# Altium PCB PCB.PcbDoc (part 2 of 2)
Units mm, origin at the board's own origin, x right, y up, seen from the top; angles counter-clockwise.
Board outline 78 x 99 mm, 2 copper layers (Top Layer, Bottom Layer); 105 components, 105 nets, 448 pads, 406 vias.
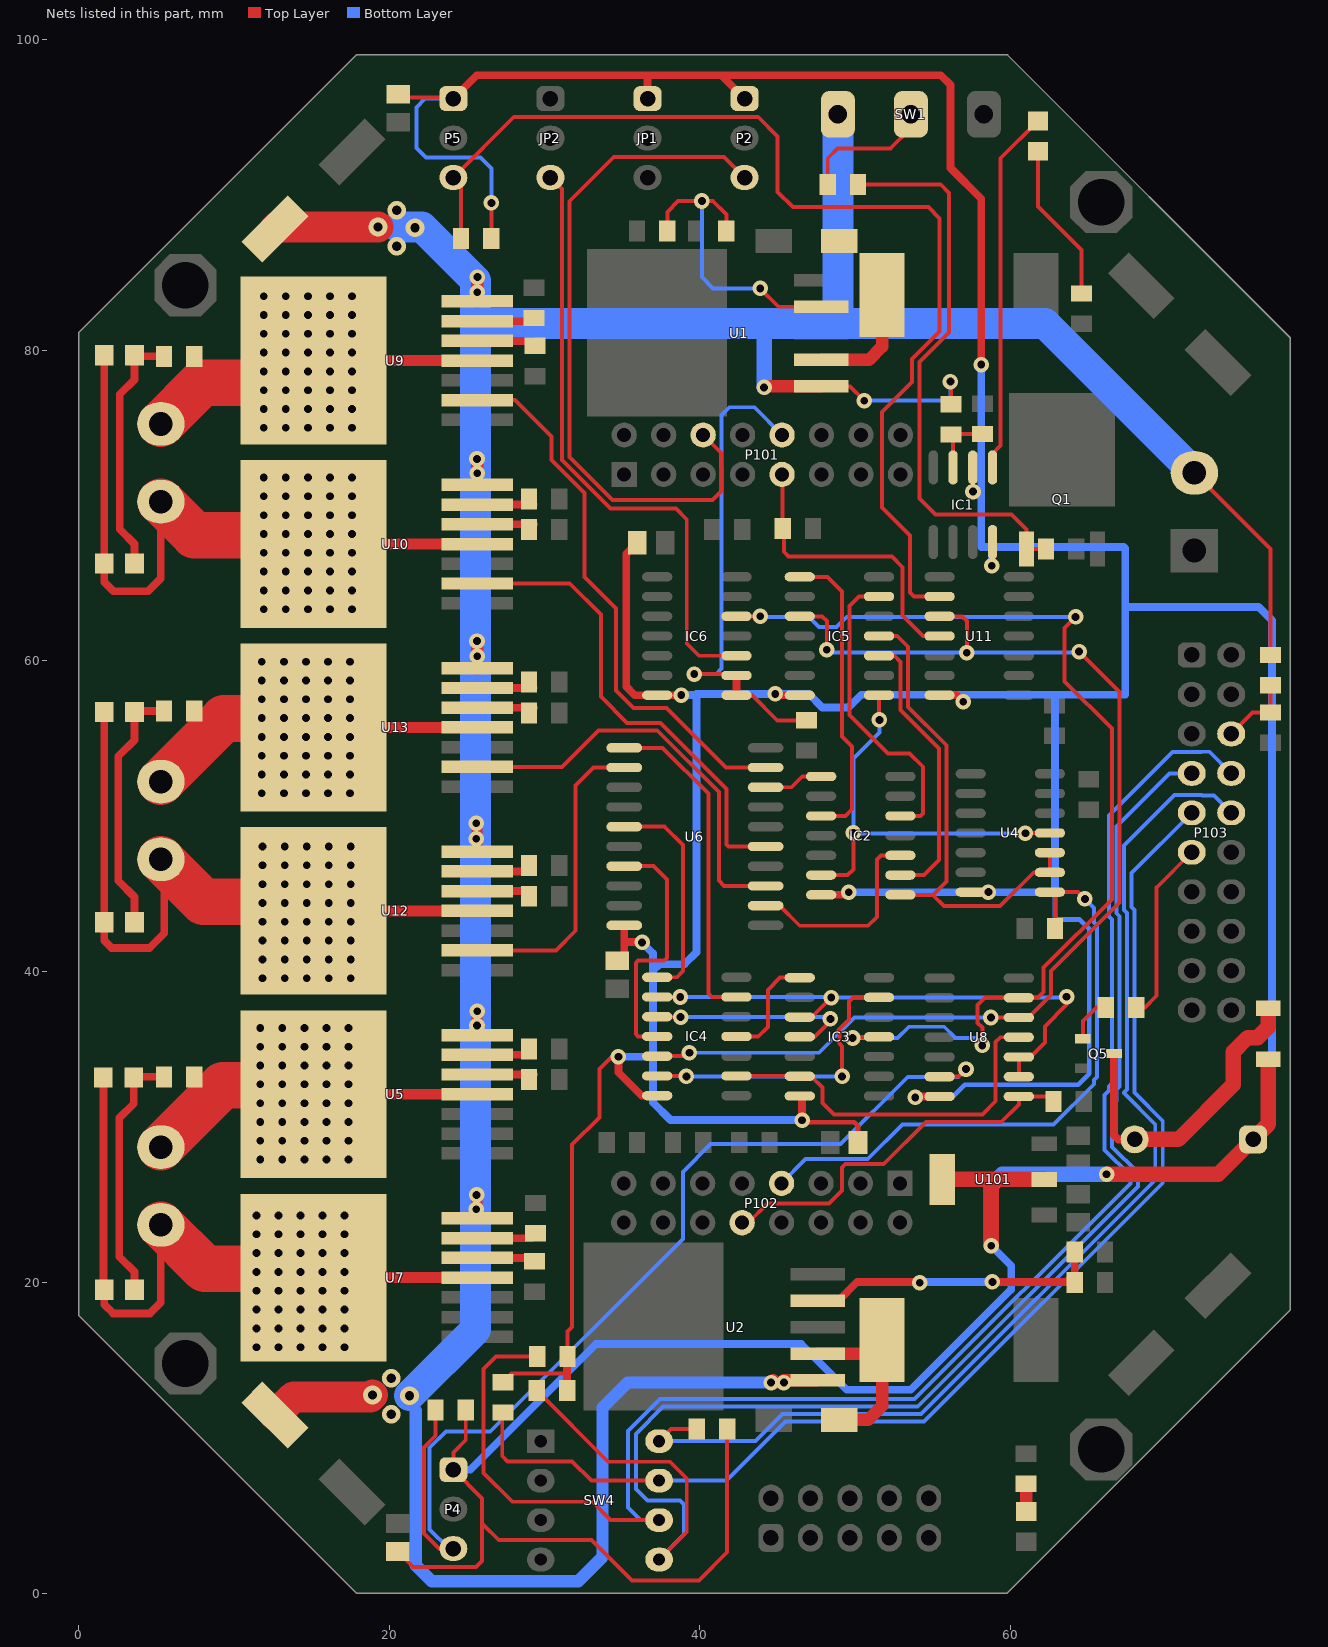
[diagram p2: the nets of this part, all layers, seen from the top]

## Via types
v1: diameter 1, hole 0.5, Top Layer to Bottom Layer, tented both sides, 398 vias
v2: diameter 1.2, hole 0.6, Top Layer to Bottom Layer, tented both sides, 8 vias

## Nets (pads, with @x,y where several pads share a name; then routed paths per layer and width w, separated by ;. In a path a pad name is that pad's centre, name@x,y a point inside that pad or via, vN(x,y) a via of type N, cw(c..) or ccw(c..) an arc to the next point about the centre after c; other vN are vias at no path point) (continued)
IN1B_: IC2.3 U6.2 | length 13.6
  Top Layer w0.254: U6.2@43.85,44.245 45.13,44.245 46.425,42.95 50.825,42.95 51.4,43.525 51.4,47.225 51.655,47.48 IC2.3@52.9,47.48
IN2A: U6.9 U9.2 | length 35.5
  Top Layer w0.254: U9.2@25.658,76.785 28.09,76.785 30.442,74.433 30.442,72.925 32.575,70.793 32.575,65.39 34.59,63.375 34.59,58.1 35.717,56.973 37.85,56.973 41.687,53.135 U6.9@44.225,53.135
IN2A_: IC4.6 U6.11 | length 20.6
  Top Layer w0.254: U6.11@35.925,54.405 37.595,54.405 40.543,51.457 40.543,38.582 40.76,38.365 IC4.6@42.35,38.365
IN2B: U6.5 U10.2 | length 30.8
  Top Layer w0.254: U10.2@25.658,64.98 31.62,64.98 33.625,62.975 33.625,57.7 35.317,56.008 37.45,56.008 41.708,51.75 41.708,48.175 41.828,48.055 U6.5@44.225,48.055
IN2B_: IC4.8 U6.15 | length 13.4
  Top Layer w0.254: U6.15@35.925,49.325 37.725,49.325 38.9,48.15 38.9,40.025 38.51,39.635 IC4.8@37.25,39.635
IN3A: U6.12 U12.2 | length 19.8
  Top Layer w0.254: U12.2@25.658,41.37 30.745,41.37 32.002,42.627 32.002,51.977 33.16,53.135 U6.12@35.125,53.135
IN3A_: IC2.8 U6.8 | length 4.2
  Top Layer w0.254: U6.8@43.85,51.865 45.89,51.865 46.585,52.56 IC2.8@47.8,52.56
IN3B: U6.3 U13.2 | length 27
  Top Layer w0.254: U13.2@25.658,53.175 31.125,53.175 33.475,55.525 37.25,55.525 41.225,51.55 41.225,45.85 41.56,45.515 U6.3@44.225,45.515
IN3B_: IC4.11 U6.17 | length 15.5
  Top Layer w0.254: U6.17@35.925,46.785 37.015,46.785 37.875,45.925 37.875,40.875 37.7,40.7 36.025,40.7 35.875,40.55 35.875,35.975 36.025,35.825 IC4.11@37.25,35.825
IS1: R32.1 U5.6 | length 3.6
  Top Layer w0.5: U5.6@25.658,34.645 R32.1@29.27,34.645
IS2: R35.1 U7.6 | length 3.5
  Top Layer w0.5: U7.6@25.658,22.84 R35.1@29.19,22.84
IS3: R38.1 U9.6 | length 3.6
  Top Layer w0.5: U9.6@25.658,81.865 R38.1@29.265,81.865
IS4: R41.1 U10.6 | length 3.6
  Top Layer w0.5: U10.6@25.658,70.06 R41.1@29.285,70.06
IS5: R45.2 U12.6 | length 3.6
  Top Layer w0.5: U12.6@25.658,46.45 R45.2@29.275,46.45
IS6: R43.2 U13.6 | length 3.6
  Top Layer w0.5: U13.6@25.658,58.255 R43.2@29.28,58.255
M1A: P3.1 R33.2 U5.4 U5.8 | length 23.5
  Top Layer w0.5: U5.8@15.117,32.105 U5.8@17.525,32.105
  Top Layer w0.7: U5.8@17.525,32.105 U5.4@25.658,32.105
  Top Layer w3: P3.1@5.3,28.7 9.28,32.68 U5.8@16.567,32.68
  other v1: 11.7,27.9 13.119,27.9 14.537,27.9 15.956,27.9 17.375,27.9 11.7,29.111 13.119,29.111 14.537,29.111 15.956,29.111 17.375,29.111 11.7,30.321 13.119,30.321 14.537,30.321 15.956,30.321 17.375,30.321 11.7,31.532 13.119,31.532 14.537,31.532 15.956,31.532 17.375,31.532 11.7,32.743 13.119,32.743 14.537,32.743 15.956,32.743 17.375,32.743 11.7,33.954 13.119,33.954 14.537,33.954 15.956,33.954 17.375,33.954 11.7,35.164 13.119,35.164 14.537,35.164 15.956,35.164 17.375,35.164 11.7,36.375 13.119,36.375 14.537,36.375 15.956,36.375 17.375,36.375
M1B: D14.1 D15.2 P3.2 U7.4 U7.8 | length 46.8
  Top Layer w0.5: D15.2@1.6,33.175 1.6,19.575 D14.1@1.65,19.525 1.65,18.575 2.225,18 4.6,18 5.3,18.7 P3.2@5.3,23.7 ; U7.8@15.117,20.3 U7.8@17.975,20.3
  Top Layer w0.6: U7.8@17.975,20.3 U7.8@18.875,20.3
  Top Layer w0.7: U7.8@18.875,20.3 U7.4@25.658,20.3
  Top Layer w3: P3.2@5.3,23.7 8.125,20.875 U7.8@16.567,20.875
  other v1: 11.45,15.825 12.869,15.825 14.287,15.825 15.706,15.825 17.125,15.825 11.45,17.036 12.869,17.036 14.287,17.036 15.706,17.036 17.125,17.036 11.45,18.246 12.869,18.246 14.287,18.246 15.706,18.246 17.125,18.246 11.45,19.457 12.869,19.457 14.287,19.457 15.706,19.457 17.125,19.457 11.45,20.668 12.869,20.668 14.287,20.668 15.706,20.668 17.125,20.668 11.45,21.879 12.869,21.879 14.287,21.879 15.706,21.879 17.125,21.879 11.45,23.089 12.869,23.089 14.287,23.089 15.706,23.089 17.125,23.089 11.45,24.3 12.869,24.3 14.287,24.3 15.706,24.3 17.125,24.3
M2A: P6.1 R39.2 U9.4 U9.8 | length 23.7
  Top Layer w0.7: U9.8@15.117,79.325 U9.4@25.658,79.325
  Top Layer w3: P6.1@5.3,75.25 7.95,77.9 U9.8@14.567,77.9 ; U9.8@13.117,77.325 U9.8@15.117,79.325
  other v1: 11.925,75 13.344,75 14.762,75 16.181,75 17.6,75 11.925,76.211 13.344,76.211 14.762,76.211 16.181,76.211 17.6,76.211 11.925,77.421 13.344,77.421 14.762,77.421 16.181,77.421 17.6,77.421 11.925,78.632 13.344,78.632 14.762,78.632 16.181,78.632 17.6,78.632 11.925,79.843 13.344,79.843 14.762,79.843 16.181,79.843 17.6,79.843 11.925,81.054 13.344,81.054 14.762,81.054 16.181,81.054 17.6,81.054 11.925,82.264 13.344,82.264 14.762,82.264 16.181,82.264 17.6,82.264 11.925,83.475 13.344,83.475 14.762,83.475 16.181,83.475 17.6,83.475
M2B: D16.1 D17.2 P6.2 U10.4 U10.8 | length 46.5
  Top Layer w0.5: D17.2@1.65,79.675 D16.1@1.65,66.275 1.65,65.075 2.25,64.475 4.475,64.475 5.3,65.3 P6.2@5.3,70.25
  Top Layer w0.7: U10.8@15.117,67.52 16.567,67.52 U10.4@25.658,67.52
  Top Layer w3: P6.2@5.3,70.25 7.455,68.095 11.925,68.095 13.344,68.095 15.117,68.095 U10.8@16.567,68.095
  other v1: 11.925,63.325 13.344,63.325 14.762,63.325 16.181,63.325 17.6,63.325 11.925,64.536 13.344,64.536 14.762,64.536 16.181,64.536 17.6,64.536 11.925,65.746 13.344,65.746 14.762,65.746 16.181,65.746 17.6,65.746 11.925,66.957 13.344,66.957 14.762,66.957 16.181,66.957 17.6,66.957 11.925,68.168 13.344,68.168 14.762,68.168 16.181,68.168 17.6,68.168 11.925,69.379 13.344,69.379 14.762,69.379 16.181,69.379 17.6,69.379 11.925,70.589 13.344,70.589 14.762,70.589 16.181,70.589 17.6,70.589 11.925,71.8 13.344,71.8 14.762,71.8 16.181,71.8 17.6,71.8
M3A: D18.1 D19.2 P7.2 U12.4 U12.8 | length 47
  Top Layer w0.5: D19.2@1.65,56.7 D18.1@1.65,43.175 1.65,42 2.125,41.525 4.575,41.525 5.525,42.475 5.525,47 P7.2@5.3,47.225 ; U12.8@15.117,43.91 U12.8@16.975,43.91
  Top Layer w0.7: U12.8@16.975,43.91 U12.4@25.658,43.91
  Top Layer w3: P7.2@5.3,47.225 8.04,44.485 U12.8@16.567,44.485
  other v1: 11.85,39.575 13.269,39.575 14.687,39.575 16.106,39.575 17.525,39.575 11.85,40.786 13.269,40.786 14.687,40.786 16.106,40.786 17.525,40.786 11.85,41.996 13.269,41.996 14.687,41.996 16.106,41.996 17.525,41.996 11.85,43.207 13.269,43.207 14.687,43.207 16.106,43.207 17.525,43.207 11.85,44.418 13.269,44.418 14.687,44.418 16.106,44.418 17.525,44.418 11.85,45.629 13.269,45.629 14.687,45.629 16.106,45.629 17.525,45.629 11.85,46.839 13.269,46.839 14.687,46.839 16.106,46.839 17.525,46.839 11.85,48.05 13.269,48.05 14.687,48.05 16.106,48.05 17.525,48.05
M3B: P7.1 R46.2 U13.4 U13.8 | length 23.5
  Top Layer w0.7: U13.8@15.117,55.715 U13.4@25.658,55.715
  Top Layer w3: P7.1@5.3,52.225 9.365,56.29 U13.8@16.567,56.29
  other v1: 11.8,51.475 13.219,51.475 14.637,51.475 16.056,51.475 17.475,51.475 11.8,52.686 13.219,52.686 14.637,52.686 16.056,52.686 17.475,52.686 11.8,53.896 13.219,53.896 14.637,53.896 16.056,53.896 17.475,53.896 11.8,55.107 13.219,55.107 14.637,55.107 16.056,55.107 17.475,55.107 11.8,56.318 13.219,56.318 14.637,56.318 16.056,56.318 17.475,56.318 11.8,57.529 13.219,57.529 14.637,57.529 16.056,57.529 17.475,57.529 11.8,58.739 13.219,58.739 14.637,58.739 16.056,58.739 17.475,58.739 11.8,59.95 13.219,59.95 14.637,59.95 16.056,59.95 17.475,59.95
NetBZ1_2: BZ1.2 D13.1 Q5.3 | length 20.7
  Top Layer w0.5: Q5.3@66.65,34.725 66.65,29.475 66.925,29.2 BZ1.2@67.98,29.2
  Top Layer w1: BZ1.2@67.98,29.2 70.8,29.2 74.325,32.725 74.325,34.825 75.25,35.75 75.9,35.75 76.575,36.425 D13.1@76.575,37.65
NetD1_2: D1.2 L1.1 U1.2 | length 7.6
  Top Layer w0.8: U1.2@47.814,79.378 50.878,79.378 51.725,80.225 L1.1@51.725,83.55
NetD2_1: D2.1 R3.1 | length 1.8
  Top Layer w0.8: D2.1@61,5.25 R3.1@61,7.025
NetD3_2: D3.2 L2.1 U2.2 | length 11.9
  Top Layer w0.8: U2.2@47.589,15.403 50.853,15.403 L2.1@51.725,16.275 51.725,12.05 50.825,11.15 D3.2@48.95,11.15
NetD14_2: D14.2 D15.1 R33.1 | length 16.4
  Top Layer w0.5: D14.2@3.6,19.525 3.6,20.675 2.625,21.65 2.625,30.575 3.55,31.5 D15.1@3.55,33.175 3.6,33.225 R33.1@5.5,33.225
NetD16_2: D16.2 D17.1 R39.1 | length 16.1
  Top Layer w0.5: D16.2@3.6,66.275 3.6,67.525 2.65,68.475 2.65,77.15 3.6,78.1 D17.1@3.6,79.675 3.675,79.6 R39.1@5.5,79.6
NetD18_2: D18.2 D19.1 R46.1 | length 16.3
  Top Layer w0.5: D18.2@3.6,43.175 3.6,44.8 2.55,45.85 2.55,53.85 3.6,54.9 D19.1@3.6,56.7 3.675,56.775 R46.1@5.5,56.775
NetIC1_1: IC1.1 LED1.2 | length 23.5
  Top Layer w0.254: IC1.1@58.83,72.45 58.83,73.33 59.35,73.85 59.35,92.35 LED1.2@61.75,94.75
NetIC1_3: IC1.3 R5.1 R505.2 | length 4.2
  Top Layer w0.254: IC1.3@56.29,72.45 56.29,74.435 R5.1@56.15,74.575 56.175,74.6 R505.2@58.175,74.6
NetIC2_2: IC2.2 IC5.3 | length 18.2
  Top Layer w0.254: IC5.3@51.525,60.33 52.52,60.33 52.91,59.94 52.91,56.833 55.375,54.368 55.375,47.175 54.425,46.225 52.915,46.225 IC2.2@52.9,46.21
NetIC2_5: IC2.5 IC5.6 | length 19.8
  Top Layer w0.254: IC5.6@51.525,64.14 50.24,64.14 49.633,63.533 49.633,56.51 52.093,54.05 53.485,54.05 54.35,53.185 54.35,50.175 54.195,50.02 IC2.5@52.9,50.02
NetIC2_10: IC2.10 IC5.8 | length 19.6
  Top Layer w0.254: IC5.8@46.425,65.41 48.215,65.41 49.15,64.475 49.15,55.135 49.8,54.485 49.8,50.45 49.37,50.02 IC2.10@47.8,50.02
NetIC3_6: IC3.6 IC4.13 | length 19.2
  Top Layer w0.254: IC4.13@37.25,33.285 39.09,33.285 v1(39.125,33.25) ; v1(49.15,33.25) 49.15,35.19 48.969,35.371 48.969,36.206 48.925,36.25 49.6,36.925 49.6,38.075 49.865,38.34 IC3.6@51.525,38.34
  Bottom Layer w0.254: v1(39.125,33.25) 39.175,33.3 39.225,33.25 v1(49.15,33.25)
NetIC3_8: IC3.8 IC4.4 | length 7
  Top Layer w0.254: IC4.4@42.35,35.825 43.75,35.825 44.367,36.442 44.367,38.817 45.16,39.61 IC3.8@46.425,39.61
NetIC3_11: IC3.11 IC4.10 | length 13.7
  Top Layer w0.254: IC4.10@37.25,37.095 v1@38.28,37.095 ; IC3.11@46.425,35.8 47.375,35.8 48.4,36.825 v1(48.4,36.95)
  Bottom Layer w0.254: v1(38.75,37.075) 48.6,37.075 48.475,36.95 v1(48.4,36.95)
NetIC6_3: IC6.3 JP2.3 | length 39.6
  Top Layer w0.254: JP2.3@30.375,91.11 31.125,90.36 31.125,72.925 34.25,69.8 38.45,69.8 39.15,69.1 39.15,61.125 39.945,60.33 IC6.3@42.35,60.33
NetLED1_1: LED1.1 R4.1 | length 10.3
  Top Layer w0.254: LED1.1@61.75,92.8 61.75,89.25 64.55,86.45 R4.1@64.55,83.65
NetP4_3: P4.3 R110.2 U8.13 | length 66.9
  Top Layer w0.254: R110.2@22.975,11.775 22.975,10.125 22.225,9.375 22.225,3.825 23.19,2.86 P4.3@24.125,2.86 ; U8.13@55.425,33.235 56.635,33.235 v1(57.125,33.725)
  Bottom Layer w0.254: P4.3@24.125,2.86 23.84,2.86 22.6,4.1 22.6,9.35 23.65,10.4 26.5,10.4 38.9,22.8 38.9,27.1 40.69,28.89 49.04,28.89 53.375,33.225 56.625,33.225 v1(57.125,33.725)
NetP5_3: P5.3 R111.2 U11.9 | length 70.2
  Top Layer w0.254: R111.2@24.625,87.2 24.625,90.61 P5.3@24.125,91.11 28.015,95 43.75,95 44.987,93.762 44.987,90.188 45.975,89.2 54.7,89.2 55.425,88.475 55.425,81.207 53.642,79.425 53.642,77.942 51.725,76.025 51.725,69.875 53.533,68.067 53.533,64.392 53.785,64.14 U11.9@55.425,64.14
NetQ1_1: Q1.1 R1.1 R2.2 | length 36.8
  Top Layer w0.254: R1.1@50.175,90.65 55.5,90.65 56.025,90.125 56.025,81.125 54.125,79.225 54.125,70.45 55.162,69.413 60.062,69.413 61.02,68.455 Q1.1@61.02,67.2 R2.2@62.275,67.2
NetQ5_1: Q5.1 R30.2 | length 3
  Top Layer w0.254: Q5.1@64.65,35.675 64.65,36.825 65.525,37.7 R30.2@66.125,37.7
NetR1_2: R1.2 SW1.2 | length 8.7
  Top Layer w0.254: R1.2@48.225,90.65 48.225,92.35 48.85,92.975 52.25,92.975 53.575,94.3 SW1.2@53.575,95.175
NetR501_1: R501.1 R502.2 U2.4 | length 19.1
  Top Layer w0.5: U2.4@47.589,18.818 48.918,18.818 50.125,20.025 v1@54.15,20.025 ; v1(58.825,20.025) 64.075,20.025 R501.1@64.125,19.975 R502.2@64.125,21.95
  Bottom Layer w0.5: v1(54.15,19.975) 54.2,20.025 v1(58.825,20.025)
NetR503_1: R503.1 R504.2 U1.4 | length 20.1
  Top Layer w0.254: R503.1@37.9,87.675 37.9,88.9 38.6,89.6 v1(40.125,89.6) 40.825,89.6 41.7,88.725 R504.2@41.7,87.675 ; v1(43.875,83.975) 45.057,82.793 U1.4@47.814,82.793
  Bottom Layer w0.254: v1(40.125,89.6) 40.125,84.7 40.85,83.975 v1(43.875,83.975)
P1: IC2.13 IC5.1 U4.4 | length 26.8
  Top Layer w0.254: IC2.13@47.8,46.21 49.51,46.21 49.875,46.575 v1(49.875,48.925) ; IC5.1@51.525,57.79 51.525,56.225 v1(51.55,56.2) ; v1(60.95,48.9) 60.975,48.925 U4.4@62.525,48.925
  Bottom Layer w0.254: v1(51.55,56.2) 51.55,55.4 49.875,53.725 v1(49.875,48.925) 49.9,48.9 v1(60.95,48.9)
P1~: IC2.1 IC5.4 U4.2 U4.3 | length 31.6
  Top Layer w0.254: IC5.4@51.525,61.6 52.7,61.6 53.392,60.908 53.392,57.033 55.858,54.567 55.858,45.808 54.99,44.94 54.985,44.94 ; IC2.1@52.9,44.94 54.985,44.94 ; U4.3@62.525,47.655 U4.2@62.525,46.385 61.485,46.385 59.325,44.225 55.7,44.225 54.985,44.94
P2: IC3.13 IC4.2 U8.4 | length 24.1
  Top Layer w0.254: IC4.2@42.4,33.335 IC4.2@42.35,33.285 46.4,33.285 IC3.13@46.425,33.26 47.165,33.26 47.875,32.55 47.875,31.55 48.625,30.8 58.175,30.8 59.031,31.656 59.031,35.456 59.35,35.775 U8.4@60.525,35.775
P2~: IC3.10 IC4.9 U8.2 U8.3 | length 36.4
  Top Layer w0.254: IC4.9@37.25,38.365 v1(38.725,38.365) ; IC3.10@46.425,37.07 47.195,37.07 v1(48.45,38.325) ; U8.2@60.525,33.235 U8.3@60.525,34.505 61.28,34.505 62.2,35.425 62.2,36.475 63.6,37.875 v1(63.6,38.375)
  Bottom Layer w0.254: v1(38.725,38.365) 48.41,38.365 v1(48.45,38.325) 63.9,38.325 63.85,38.375 v1(63.6,38.375)
P3: IC3.4 IC6.5 U8.6 | length 68.1
  Top Layer w0.254: IC6.5@42.35,62.87 v1(43.875,62.87) ; v1(49.825,35.725) 49.9,35.8 IC3.4@51.525,35.8 ; v1(58.175,35.25) 58.175,36.39 57.874,36.691 57.874,37.839 58.35,38.315 U8.6@60.525,38.315 61.74,38.315 62.117,38.692 62.117,40.25 66.51,44.642 66.51,55.64 63.475,58.675 63.475,62.125 v1(64.175,62.825)
  Bottom Layer w0.254: v1(43.875,62.87) 43.92,62.825 47.025,62.825 47.675,62.175 48.8,62.175 49.45,62.825 v1(64.175,62.825) ; v1(49.825,35.725) 52.725,35.725 53.45,36.45 55.725,36.45 56.425,35.75 56.425,35.725 57.7,35.725 v1(58.175,35.25)
P3~: IC4.12 IC5.10 U8.5 U11.10 | length 76
  Top Layer w0.254: IC4.12@37.25,34.555 39.105,34.555 v1(39.325,34.775) ; IC5.10@46.425,62.87 47.855,62.87 48.167,62.558 v1(48.167,60.711) ; U11.10@55.425,62.87 56.88,62.87 57.175,62.575 v1(57.175,60.525) ; v1(58.73,37.045) U8.5@60.525,37.045 61.152,37.045 62.6,38.493 62.6,40.05 66.992,44.442 66.992,58.008 v1(64.4,60.6)
  Bottom Layer w0.254: v1(39.325,34.775) 47.665,34.775 49.935,37.045 v1(58.73,37.045) ; v1(48.167,60.711) 48.189,60.711 48.375,60.525 v1(57.175,60.525) 64.325,60.525 v1(64.4,60.6)
PWM1: P102.7 R101.2 U4.1 | length 40.4
  Top Layer w0.254: R101.2@62.85,42.35 R101.2@62.85,42.775 62.85,44.79 U4.1@62.525,45.115 64.335,45.115 v1(64.775,44.675)
  Bottom Layer w0.254: P102.7@45.255,26.375 46.805,27.925 50.8,27.925 53.033,30.158 62.768,30.158 65.36,32.75 65.36,33.02 65.556,33.216 65.556,42.964 65.36,43.159 65.36,44.09 v1(64.775,44.675)
PWM2: P102.10 R102.2 U8.1 | length 24.7
  Top Layer w0.254: P102.10@42.715,23.835 43.11,23.835 44.35,25.075 48.3,25.075 49.144,25.919 49.144,27.397 49.353,27.606 51.831,27.606 54.542,30.317 59.392,30.317 60.525,31.45 U8.1@60.525,31.965 62.435,31.965 R102.2@62.75,31.65
PWM3: P101.9 R103.2 U11.11 | length 19.1
  Top Layer w0.254: P101.9@45.285,72 45.325,71.96 R103.2@45.325,68.525 45.4,68.45 45.4,67.025 45.7,66.725 52.35,66.725 53.05,66.025 53.05,62.907 54.357,61.6 U11.11@55.425,61.6
SERVO: IC6.1 IC6.2 P101.10 R36.1 | length 32.7
  Top Layer w0.254: v1(39.625,59.15) 42.04,59.15 42.24,58.95 IC6.2@42.35,59.06 ; IC6.1@42.35,57.79 43.36,57.79 44.975,56.175 R36.1@46.85,56.175
  Top Layer w0.5: IC6.1@42.35,57.79 IC6.2@42.35,59.06
  Bottom Layer w0.254: v1@39.575,59.15 39.575,58.975 39.625,59.025 v1(39.625,59.15) 41.05,59.15 41.4,59.5 41.4,75.825 41.9,76.325 43.5,76.325 P101.10@45.285,74.54
SPK: P103.11 R30.1 | length 11.8
  Top Layer w0.254: R30.1@68.075,37.7 68.65,37.7 69.4,38.45 69.4,45.425 P103.11@71.655,47.68
SR1: R31.1 U5.5 | length 3.7
  Top Layer w0.5: U5.5@25.658,33.375 R31.1@29.325,33.375
SR2: R34.1 U7.5 | length 3.7
  Top Layer w0.5: U7.5@25.658,21.57 R34.1@29.355,21.57
SR3: R37.1 U9.5 | length 3.7
  Top Layer w0.5: U9.5@25.658,80.595 R37.1@29.33,80.595
SR4: R40.1 U10.5 | length 3.7
  Top Layer w0.5: U10.5@25.658,68.79 R40.1@29.31,68.79
SR5: R44.2 U12.5 | length 3.5
  Top Layer w0.5: U12.5@25.658,45.18 R44.2@29.125,45.18
SR6: R42.2 U13.5 | length 3.7
  Top Layer w0.5: U13.5@25.658,56.985 R42.2@29.315,56.985
STEER_VR: P2.3 P101.6 | length 44.7
  Top Layer w0.254: P101.6@40.205,74.54 41.35,73.395 41.35,72.507 41.373,72.484 41.373,70.923 40.809,70.359 34.374,70.359 31.608,73.125 31.608,89.583 34.45,92.425 41.56,92.425 P2.3@42.875,91.11
SW1: P103.7 R13.2 SW4.5 | length 98.5
  Top Layer w0.254: R13.2@29.5,13.025 34.075,8.45 38.075,8.45 39.15,7.375 39.15,3.935 SW4.5@37.37,2.155
  Bottom Layer w0.254: SW4.5@37.37,2.155 38.975,3.76 38.975,5.7 38.725,5.95 36.625,5.95 35.875,6.7 35.875,10.242 37.626,11.993 54.018,11.993 68.188,26.162 68.188,27.062 66.533,28.717 66.533,31.4 66.81,31.677 66.81,32.422 67.003,32.616 67.003,43.563 66.81,43.757 66.81,49.335 70.235,52.76 P103.7@71.655,52.76
SW2: P103.8 R15.2 SW4.6 | length 104
  Top Layer w0.254: R15.2@29.525,15.225 26.875,15.225 26.075,14.425 26.075,7.725 27.925,5.875 33.075,5.875 34.255,4.695 SW4.6@37.37,4.695
  Bottom Layer w0.254: SW4.6@37.37,4.695 36.18,4.695 35.375,5.5 35.375,10.425 37.426,12.476 53.819,12.476 67.705,26.362 67.705,26.863 66.05,28.518 66.05,32.065 66.325,32.34 66.325,32.62 66.521,32.816 66.521,43.363 66.325,43.559 66.325,50.05 70.419,54.144 72.239,54.144 72.245,54.15 72.805,54.15 P103.8@74.195,52.76
SW3: P103.9 R20.2 SW4.7 | length 80.3
  Top Layer w0.254: R20.2@26.9,11.6 27.275,11.225 27.275,8.825 27.625,8.475 31.775,8.475 33.015,7.235 SW4.7@37.37,7.235
  Bottom Layer w0.254: SW4.7@37.37,7.235 41.71,7.235 45.503,11.028 54.418,11.028 69.789,26.399 69.789,30.371 67.956,32.204 67.969,32.216 67.969,43.963 67.775,44.157 67.775,46.34 P103.9@71.655,50.22
SW4: P103.10 R23.2 SW4.8 | length 72.9
  Top Layer w0.254: SW4.8@37.37,9.775 38.145,10.55 R23.2@39.8,10.55
  Bottom Layer w0.254: SW4.8@37.37,9.775 43.567,9.775 45.303,11.511 54.218,11.511 69.307,26.599 69.307,30.171 67.292,32.185 67.292,32.222 67.486,32.416 67.486,43.763 67.292,43.957 67.292,48.117 70.551,51.376 72.284,51.376 72.335,51.325 73.09,51.325 P103.10@74.195,50.22
V_IN: C1.1 C4.1 P1.2 R5.2 R9.2 SW1.3 U1.1 U2.1 U5.7 U7.7 U9.7 U10.7 U12.7 U13.7 | length 247.4
  Top Layer w0.254: U1.1@47.814,77.671 49.654,77.671 v1(50.575,76.75) ; v1(56.125,77.975) 56.15,77.95 R5.2@56.15,76.525 ; P1.2@71.825,72.1 76.725,67.2 R9.2@76.725,60.375
  Top Layer w0.7: v1(25.6,49.55) 25.658,49.492 U12.7@25.658,47.72 ; v1(25.625,25.625) 25.658,25.592 U7.7@25.658,24.11 ; U5.7@25.658,35.915 v1(25.658,37.442)
  Top Layer w0.8: v1(25.65,61.275) 25.658,61.267 U13.7@25.658,59.525 ; v1(25.65,73) 25.658,72.992 U10.7@25.658,71.33 ; U9.7@25.658,83.135 25.658,84.683 v1(25.675,84.7) ; v1(44.125,77.6) 44.196,77.671 U1.1@47.814,77.671 ; v1@44.721,13.696 v1(44.575,13.55) v1(45.404,13.55) ; v1@45.404,13.696 U2.1@47.589,13.696
  Top Layer w2: C4.1@12.65,11.45 13.825,12.625 18.8,12.625 v2(18.925,12.75) ; C1.1@12.65,87.8 12.775,87.925 v2(19.275,87.925)
  Bottom Layer w0.254: v1(50.575,76.75) 55.9,76.75 56.125,76.975 v1(56.125,77.975)
  Bottom Layer w0.8: 21.7,11.725 21.7,1.8 22.744,0.756 32.156,0.756 33.725,2.325 33.725,11.925 35.35,13.55 v1(44.575,13.55)
  Bottom Layer w1: v1(44.125,77.6) 44.125,81.713
  Bottom Layer w2: 20.6,87.925 22.1,87.925 25.55,84.475 25.55,81.713 ; v2(21.304,12.704) 25.55,16.95 25.55,81.713 ; SW1.3@48.875,95.175 48.875,82.038 49.2,81.713 ; P1.2@71.825,72.1 62.212,81.713 49.2,81.713 ; 25.55,81.713 44.125,81.713 49.2,81.713
  other v1: 25.6,24.7 25.65,36.525 25.6,48.55 25.658,60.3 25.658,72.075 25.658,83.725
  other v2: 20.129,11.504 20.125,13.825 20.479,86.679 21.654,87.879 20.475,89
VBAT: P103.6 R9.1 R11.2 | length 4.8
  Top Layer w0.254: P103.6@74.195,55.3 75.57,56.675 R11.2@76.725,56.675 R9.1@76.725,58.425
VCC: BZ1.1 C103.1 C104.1 C105.1 C106.1 C107.1 D13.2 IC1.2 IC1.8 IC2.14 IC3.14 IC4.14 IC5.14 IC6.14 JP1.1 P2.1 P4.1 P5.1 R13.1 R15.1 R20.1 R23.1 R110.1 R111.1 U4.14 U6.20 U8.14 U11.14 U101.2 U101.4 | length 462.2
  Top Layer w0.254: C106.1@20.475,96.25 24.065,96.25 P5.1@24.125,96.19 ; C107.1@20.55,2.675 21.544,1.681 25.581,1.681 25.975,2.075 25.975,4.475 ; R110.1@24.925,11.775 24.925,9.85 24.125,9.05 P4.1@24.125,7.94 25.975,6.09 25.975,4.475 ; R111.1@26.575,87.2 v1(26.575,89.475) ; R20.1@27.325,13.575 27.875,14.125 31.35,14.125 31.45,14.025 ; R15.1@31.475,15.225 31.475,16.825 31.775,17.125 31.775,28.868 33.523,30.615 33.523,33.723 34.325,34.525 v1(34.75,34.525) ; R23.1@41.75,10.55 41.75,2.625 39.925,0.8 35.625,0.8 33.025,3.4 27.05,3.4 25.975,4.475
  Top Layer w0.3: v1(46.575,30.425) 46.706,30.294 49.925,30.294 50.175,30.044 C105.1@50.175,29
  Top Layer w0.5: P5.1@24.125,96.19 25.635,97.7 36.6,97.7 ; R13.1@31.45,13.025 31.45,14.025 31.45,15.2 R15.1@31.475,15.225 ; C104.1@34.675,40.7 35.125,41.15 35.125,41.9 ; v1(34.75,34.525) 34.75,33.525 36.26,32.015 IC4.14@37.25,32.015 ; U6.20@35.125,42.975 35.125,41.9 ; C103.1@35.975,67.6 35.25,66.875 35.25,58.35 35.81,57.79 IC6.14@37.25,57.79 38.79,57.79 v1(38.8,57.8) ; v1(36.275,41.875) 36.25,41.9 35.125,41.9 ; JP1.1@36.625,96.19 36.625,97.675 36.6,97.7 ; P2.1@42.875,96.19 41.365,97.7 ; v1(44.85,57.875) 44.935,57.79 IC5.14@46.425,57.79 ; IC3.14@46.425,31.99 46.575,31.84 v1(46.575,30.425) ; IC2.14@47.8,44.94 49.415,44.94 v1(49.575,45.1) ; v1(53.85,31.9) 53.915,31.965 U8.14@55.425,31.965 ; U11.14@55.425,57.79 56.535,57.79 v1(56.95,57.375) ; v1(58.1,79.075) 58.1,89.75 56.125,91.725 56.125,97.075 55.5,97.7 41.365,97.7 ; 36.6,97.7 41.365,97.7
  Top Layer w1: U101.4@55.6,26.625 58.825,26.625 ; v1(58.75,22.35) 58.75,26.55 58.825,26.625 ; U101.2@62.15,26.625 58.825,26.625 ; v1(66.175,26.95) 73.35,26.95 BZ1.1@75.6,29.2 76.575,30.175 D13.2@76.575,34.35
  Bottom Layer w0.254: P5.1@24.125,96.19 22.315,96.19 21.75,95.625 21.75,93.025 22.375,92.4 25.875,92.4 26.575,91.7 v1(26.575,89.475)
  Bottom Layer w0.3: v1(53.85,31.9) 56.225,31.9 57.05,32.725 64.35,32.725 65.05,33.425 65.05,42.754 64.454,43.35 63.025,43.35 62.85,43.525 62.85,45.15
  Bottom Layer w0.5: P4.1@24.125,7.94 25.215,7.94 33.3,16.025 46.516,16.025 49.459,13.082 53.568,13.082 60.031,19.544 60.031,21.069 v1(58.75,22.35) ; v1(34.75,34.525) 36.944,34.525 36.969,34.5 ; v1(36.275,41.875) 36.969,41.181 36.969,40.05 ; v1(38.8,57.8) 39.7,57.8 ; v1(46.575,30.425) 46.55,30.45 38.1,30.45 36.969,31.581 36.969,34.5 ; v1(49.575,45.1) 62.8,45.1 62.85,45.15 62.85,57.825 ; v1(58.1,79.075) 58.1,67.325 58.775,67.325 ; v1(58.775,66.125) 58.775,67.325 ; BZ1.1@75.6,29.2 76.825,30.425 76.825,62.6 75.95,63.475 67.375,63.475 ; 36.969,34.5 36.969,40.05 ; 36.969,40.05 37.394,40.475 39,40.475 39.775,41.25 39.775,57.875 v1(44.85,57.875) 47,57.875 47.875,57 49.55,57 50.375,57.825 62.85,57.825 ; 58.775,67.325 67.275,67.325 67.375,67.225 67.375,63.475 ; 62.85,57.825 67.375,57.825 67.375,63.475
  Bottom Layer w1: v1(58.75,22.35) 58.75,26.25 59.45,26.95 v1(66.175,26.95)
  other v1: 58.565,45.115 57.575,70.9
pads on no net: IC1.5 IC1.6 IC1.7 IC3.3 IC5.11 IC6.8 IC6.9 IC6.10 IC6.11 IC6.12 IC6.13 U4.10 U4.11 U4.12 U4.13 U11.5 U11.6 U11.12 U11.13

## Polygon pours and split planes (outlines as drawn)
GND on Bottom Layer "GND_L02_P028" (solid, remove dead copper, pour order 28): 0,17.975 0,81.125 17.875,99 59.8,99 78,80.8 78,18.425 59.575,-0.075 17.875,0
M2A on Bottom Layer "M2A_L02_P012" (solid, remove dead copper, pour order 12): 21.05,73.35 0.225,73.35 0.225,76.325 0.225,81.1 2.925,81.1 9.925,81.1 9.925,84.9 21.05,84.9
M2B on Bottom Layer "M2B_L02_P010" (solid, remove dead copper, pour order 10): 21.075,62 0,62 0,72.425 0,72.925 21.051,72.925
M3B on Bottom Layer "M3B_L02_P008" (solid, remove dead copper, pour order 8): 21.075,50.075 0.375,50.075 0.375,52.575 0.375,61.375 21.075,61.375
M3A on Bottom Layer "M3A_L02_P006" (solid, remove dead copper, pour order 6): 21.1,38.3 0,38.3 0,49.725 0,49.575 21.075,49.575
M1A on Bottom Layer "M1A_L02_P004" (solid, remove dead copper, pour order 4): 21.1,26.6 0.15,26.6 0.15,34.225 0.15,37.55 21.075,37.55
M1B on Bottom Layer "M1B_L02_P002" (solid, remove dead copper, pour order 2): 21.125,14.85 9.6,14.85 9.6,17.55 9.6,17.575 6.575,17.575 -0.1,17.575 -0.1,18.075 -0.1,26.1 21.1,26.1
GND on Top Layer "GND_L01_P026" (solid, remove dead copper, pour order 26): 0,81.125 17.775,98.9 59.8,99 78,80.8 77.925,18.45 59.575,0.1 17.875,0 0,17.875
M1B on Top Layer "M1B_L01_P014" (solid, remove dead copper, pour order 14): 21.075,14.9 21.075,26.1 -0.15,26.1 0,26.1 0,18.025 0,17.5 1.25,17.5 9.6,17.5 9.6,14.825 9.675,14.825
M2B on Top Layer "M2B_L01_P024" (solid, remove dead copper, pour order 24): 0.1,72.9 21.1,72.9 21.1,62.05 21.1,62.025 0.275,62.025
M2A on Top Layer "M2A_L01_P022" (solid, remove dead copper, pour order 22): 0,81.125 9.975,81.125 9.975,84.9 21.075,84.9 21.15,84.9 21.15,73.4 21.15,73.3 0.2,73.3
M3B on Top Layer "M3B_L01_P020" (solid, remove dead copper, pour order 20): 0.175,61.375 21.125,61.375 21.125,50.05 0.25,50.05
M3A on Top Layer "M3A_L01_P018" (solid, remove dead copper, pour order 18): 0.225,49.475 21.025,49.475 21.025,38.3 21.025,38.275 0.35,38.275
M1A on Top Layer "M1A_L01_P016" (solid, remove dead copper, pour order 16): 0.325,37.55 21.15,37.55 21.15,26.6 21.15,26.575 0.325,26.575

## Keep-outs
Keep-Out Layer:
  the board outline again, w0.254

## Other copper
Top Layer:
  rectangle net GND: 60.125,70.25 66.275,76.625
  rectangle net V_IN: 24.975,24.275 26.175,26.325
  rectangle net V_IN: 24.975,36.025 26.325,38.15
  rectangle net V_IN: 24.95,47.925 26.275,50.125
  rectangle net V_IN: 24.95,59.6 26.375,61.9
  rectangle net V_IN: 24.975,71.55 26.325,73.525
  rectangle net V_IN: 25.075,83.275 26.275,85.25
  rectangle net M3A: 3.325,45.925 4.725,47.075
  rectangle net M3A: 4.075,45 6.875,46.6
  rectangle net M3A: 3.038,46.075 8,49.475
  rectangle net M3B: 4.175,53.525 7.1,54.375
  rectangle net M3B: 3.325,50.5 7.55,53.75
  rectangle net M2B: 3.5,68.598 7.85,72.225
  rectangle net M2A: 3.5,73.475 7.175,77.225
  rectangle net M2A: 9.875,73.675 20.4,84.9
  rectangle net M2B: 9.55,62.05 20.325,72.95
  rectangle net M3B: 9.725,50.025 20.475,61.375
  rectangle net M3A: 9.55,38.275 20.475,49.4
  rectangle net M1A: 9.95,26.575 20.071,37.55
  rectangle net M1A: 3.3,26.8 7.35,30.45
  rectangle net M1B: 9.775,14.9 21.075,26.025
  rectangle net M1B: 3.425,21.975 7.225,25.55
  region net V_IN: 22,11.3 22,14.35 18.45,14.35 18.45,11.3
  region net V_IN: 22.35,86.475 22.35,89.525 18.8,89.525 18.8,86.475
  region net NetD3_2: 53.125,10.5 53.125,15.55 50.3,15.55 50.3,10.5
  region net NetD3_2: 53.125,10.375 53.125,11.825 49.8,11.825 49.8,10.375
  region net NetD1_2: 53.175,86.15 53.175,87.85 49.125,87.85 49.125,86.15
  region net NetD1_2: 53.1,78.625 53.1,81.525 50.3,81.525 50.3,78.625
  region net 7V: 53.65,22.75 53.65,27.25 49.5,27.25 49.5,22.75
  region net GND: 38.725,22.075 38.725,24.45 33.8,24.45 33.8,22.075
  region net GND: 29.95,26.25 29.95,28.475 28.75,28.475 28.75,26.25
  region net GND: 30.625,38.25 30.625,40.6 29.1,40.6 29.1,38.25
  region net GND: 30.6,50.15 30.6,52.425 29.1,52.425 29.1,50.15
  region net GND: 30.875,61.7 30.875,64.375 29.325,64.375 29.325,61.7
  region net GND: 29.7,72.475 29.7,74.45 28.5,74.45 28.5,72.475
  region net GND: 29.8,85.375 29.8,87.55 28.425,87.55 28.425,85.375
Bottom Layer:
  rectangle net GND: 59.475,69.375 65.15,76.875
  rectangle net GND: 38.65,18.3 41.2,21.575
  rectangle net GND: 35.15,16.75 40.975,18.425
  region net M2A: 7.925,73.525 7.925,77.475 2.775,77.475 2.775,73.525
  region net M2B: 8.075,68.275 8.075,72.225 2.775,72.225 2.775,68.275
  region net M3B: 7.825,50.35 7.825,54.275 2.875,54.275 2.875,50.35
  region net M3A: 7.975,44.75 7.975,49.175 2.55,49.175 2.55,44.75
  region net M1A: 7.775,26.875 7.775,30.6 3.125,30.6 3.125,26.875
  region net M1B: 7.725,21.6 7.725,25.7 3,25.7 3,21.6
  region net V_IN: 22,11.3 22,14.35 18.5,14.35 18.5,11.3
  region net V_IN: 22.35,86.475 22.35,89.525 18.85,89.525 18.85,86.475
  region net V_IN: 45.825,13.125 45.825,14.175 44.15,14.175 44.15,13.125
  region net M1B: 19.575,15 19.575,25.6 10.325,25.6 10.325,15
  region net M1A: 19.65,26.875 19.65,37.475 10.6,37.475 10.6,26.875
  region net M3A: 19.775,38.5 19.775,49.175 10.325,49.175 10.325,38.5
  region net M3B: 19.85,50.375 19.85,60.975 10.4,60.975 10.4,50.375
  region net M2B: 19.9,62.2 19.9,72.85 10.475,72.85 10.475,62.2
  region net M2A: 19.8,73.95 19.8,84.65 10.325,84.65 10.325,73.95
  region net GND: 64.6,77.425 67.225,74.825 66.875,69.625 63.35,69.575 62.85,77.225
  region net GND: 35.55,18.775 38.234,21.578 40.275,21.575 40.375,18.175 35.55,18.125

## Silkscreen, mask and mechanical layers (free items; w line width, h text height)
Top Overlay:
  lines w0.5: 0,17.875 0,81.125 17.875,99 59.8,99 78,80.8 78,18.525 59.475,0 17.875,0 0,17.875
  text "+" at 77.55,75.075 h5 r90
  text "MOTOR 3" at 10.2,65.175 h2.5 r180
  text "-" at 77.125,62.225 h5 r90
  text "MOTOR 2" at 10.425,41.95 h2.5 r180
  text "MOTOR 1" at 0.575,34.55 h2.5
Bottom Overlay:
  drawing of 5 lines, arcs and shapes, not listed
  text "POWER BOARD" at 53.7,32.425 h5 r270